# Altium PCB EXPLORER_V3.4.PcbDoc (part 3 of 4)
Units mm, origin at the board's own origin, x right, y up, seen from the top; angles counter-clockwise.
Board outline 160 x 121.01 mm, 2 copper layers (Top Layer, Bottom Layer); 254 components, 245 nets, 1181 pads, 772 vias.
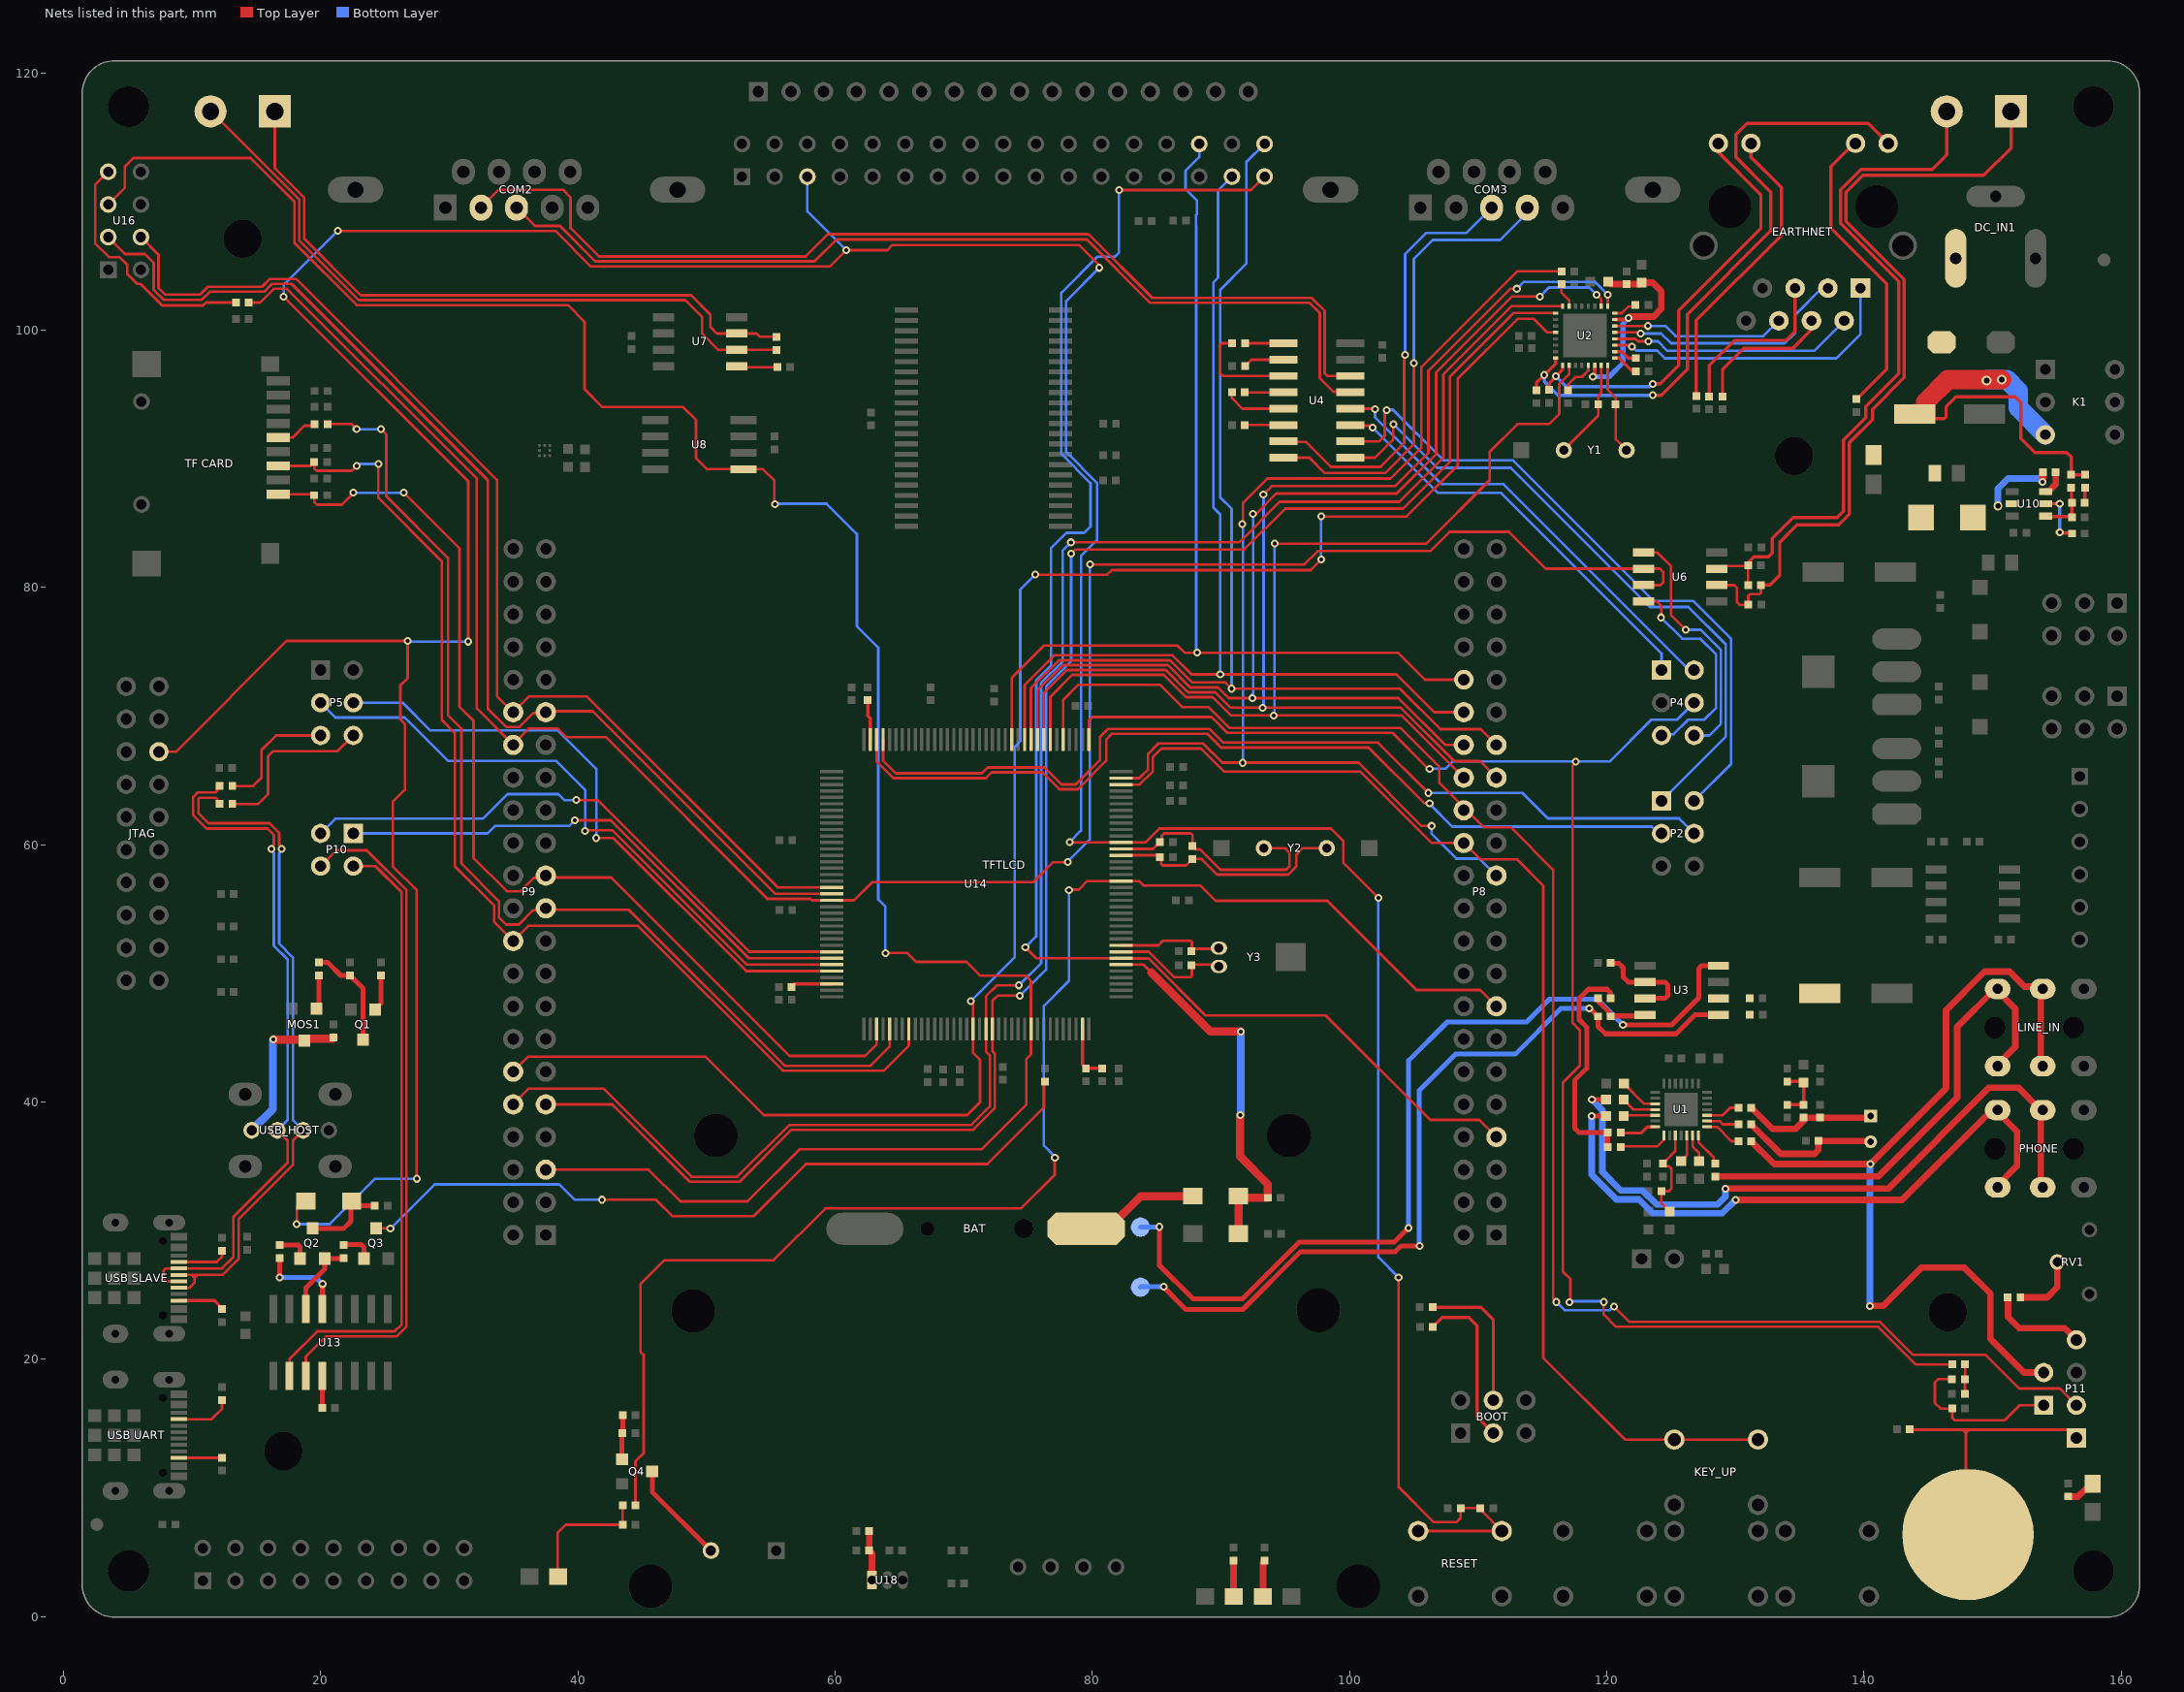
[diagram p3: the nets of this part, all layers, seen from the top]

## Via types
v1: diameter 0.61, hole 0.305, Top Layer to Bottom Layer, tented both sides, 732 vias
v2: diameter 0.762, hole 0.457, Top Layer to Bottom Layer, tented both sides, 23 vias
v3: diameter 0.6, hole 0.3, Top Layer to Bottom Layer, 12 vias
v4: diameter 0.7, hole 0.4, Top Layer to Bottom Layer, tented both sides, 5 vias

## Nets (pads, with @x,y where several pads share a name; then routed paths per layer and width w, separated by ;. In a path a pad name is that pad's centre, name@x,y a point inside that pad or via, vN(x,y) a via of type N, cw(c..) or ccw(c..) an arc to the next point about the centre after c; other vN are vias at no path point) (continued)
LIGHT_SENSOR: P8.15 R78.1 U14.19 | length 114.2
  Top Layer w0.203: R78.1@44.475,8.661 44.475,12.065 45.11,12.7 45.11,20.345 44.856,20.599 44.856,25.826 46.741,27.711 55.216,27.711 59.228,31.724 74.446,31.724 77.089,34.366 77.089,34.469 77.064,34.495 77.064,35.636 v1(77.089,35.662) ; v1(78.181,56.464) 78.231,56.514 78.942,56.514 79.611,57.183 U14.19@82.229,57.183 83.614,57.183 83.952,56.845 88.392,56.845 89.586,55.651 98.271,55.651 105.205,48.717 110.145,48.717 P8.15@111.419,47.443
  Bottom Layer w0.203: v1(77.089,35.662) 77.089,35.763 76.225,36.627 76.225,47.476 78.181,49.432 v1(78.181,56.464)
LINEIN_L: C19.1 LINE_IN.2 P1.2 | length 70.8
  Top Layer w0.508: C19.1@131.242,36.957 133.02,35.179 v1(140.487,35.179) 146.38,41.072 146.38,47.142 149.377,50.14 151.308,50.14 152.472,48.975 153.539,48.975 153.744,48.771 LINE_IN.2@153.744,42.771 ; v1(140.462,24.155) 141.478,24.155 144.45,27.127 147.81,27.127 149.835,25.103 149.835,21.59 152.451,18.974 P1.2@153.975,18.974
  Bottom Layer w0.508: v1(140.462,24.155) 140.462,35.082 140.468,35.088 140.468,35.16 v1(140.487,35.179)
LINEIN_R: C21.1 LINE_IN.1 | length 38.3
  Top Layer w0.508: C21.1@128.448,34.214 141.097,34.214 147.244,40.361 147.244,45.847 150.168,48.771 150.244,48.771 151.765,47.25 151.765,44.292 LINE_IN.1@150.244,42.771
LINK_LED: EARTHNET.12 R6.2 U2.25 | length 34.2
  Top Layer w0.254: R6.2@115.519,95.361 115.519,95.885 v1(116.053,96.418) 116.566,96.932 U2.25@116.566,97.282 ; v1(123.571,95.834) 124.155,95.834 125.603,97.282 125.603,101.524 131.978,107.899 131.978,110.541 128.68,113.839 EARTHNET.12@128.68,114.526
  Bottom Layer w0.254: v1(116.053,96.418) 116.865,95.606 123.342,95.606 v1(123.571,95.834)
MIC_N: C23.2 U1.23 | length 2.5
  Top Layer w0.203: U1.23@127.806,38.521 128.764,38.521 129.007,38.278 C23.2@130.242,38.278
MIC_P: C22.2 U1.24 | length 2.7
  Top Layer w0.203: U1.24@127.806,38.971 129.012,38.971 129.589,39.548 C22.2@130.242,39.548
NetBAT_1: BAT.1 D5.1 | length 9.3
  Top Layer w0.635: BAT.1@79.518,30.15 81.229,30.15 83.769,32.69 D5.1@87.808,32.69
NetBEEP_2: BEEP.2 Q4.3 | length 8
  Top Layer w0.381: Q4.3@45.777,11.278 45.777,9.696 BEEP.2@50.343,5.131
NetBOOT_3: BOOT.3 R73.1 | length 12.9
  Top Layer w0.254: R73.1@106.477,22.53 107.213,23.266 109.271,23.266 109.906,22.631 109.906,15.545 BOOT.3@111.176,14.275
NetBOOT_4: BOOT.4 R74.2 | length 11.4
  Top Layer w0.254: R74.2@106.461,24.054 110.211,24.054 111.176,23.089 BOOT.4@111.176,16.815
NetC3_2: C3.2 C4.2 R2.2 U1.17 | length 7.7
  Top Layer w0.203: C4.2@124.893,31.483 124.241,32.136 R2.2@124.241,33.071 124.841,33.071 125.019,33.249 125.019,34.823 124.818,35.024 124.574,35.024 C3.2@124.384,35.214 124.582,35.412 124.582,35.454 125.331,36.202 U1.17@125.331,37.396
NetC7_2: C7.2 C8.1 L1.2 U2.7 U2.30 | length 17.3
  Top Layer w0.305: v1(118.923,96.393) 119.066,96.536 U2.30@119.066,97.282 ; U2.7@120.616,100.832 121.584,100.832 v1(121.691,100.94)
  Top Layer w0.508: L1.2@120.104,103.783 120.305,103.581 C7.2@121.539,103.581 122.592,103.581 C8.1@122.707,103.696 123.583,103.696 124.231,103.048 124.231,101.651 123.649,101.069 121.82,101.069 v1(121.691,100.94)
  Bottom Layer w0.381: v1(118.923,96.393) 120.193,96.393 121.26,97.46 121.26,100.508 v1(121.691,100.94)
NetC10_1: C10.1 U1.12 | length 2.5
  Top Layer w0.203: C10.1@121.323,38.911 121.383,38.971 U1.12@123.756,38.971
NetC10_2: C10.2 PHONE.1 | length 49
  Top Layer w0.381: v1(118.821,38.913) C10.2@119.939,38.913
  Top Layer w0.508: v1(130.007,32.385) 142.951,32.385 149.939,39.373 150.244,39.373 151.892,37.725 151.892,35.021 PHONE.1@150.244,33.373
  Bottom Layer w0.508: v1(118.821,38.913) 118.821,34.366 120.752,32.436 122.504,32.436 123.584,31.356 128.978,31.356 v1(130.007,32.385)
NetC11_1: C11.1 U1.11 | length 2.7
  Top Layer w0.203: C11.1@121.323,40.181 122.083,39.421 U1.11@123.756,39.421
NetC11_2: C11.2 PHONE.2 | length 53
  Top Layer w0.381: v1(118.847,40.183) C11.2@119.939,40.183
  Top Layer w0.508: v1(129.235,33.274) 141.884,33.274 149.733,41.123 151.994,41.123 153.744,39.373 PHONE.2@153.744,33.373
  Bottom Layer w0.508: v1(118.847,40.183) 119.659,39.37 119.659,34.569 121.107,33.122 122.788,33.122 123.868,32.042 128.613,32.042 129.235,32.664 v1(129.235,33.274)
NetC12_1: C12.1 U1.15 | length 3.9
  Top Layer w0.203: C12.1@121.082,36.5 121.133,36.551 123.927,36.551 124.417,37.041 124.417,37.382 U1.15@124.431,37.396
NetC13_1: C13.1 U1.14 | length 2.9
  Top Layer w0.254: C13.1@121.082,37.643 121.133,37.592 122.659,37.592 123.138,38.071 U1.14@123.756,38.071
NetC14_1: C14.1 C15.2 R3.2 R5.2 | length 4.3
  Top Layer w0.254: R3.2@134.036,39.786 R5.2@135.306,39.786 C14.1@135.306,41.529 135.239,41.596 C15.2@134.036,41.596
NetC16_2: C16.2 U1.10 | length 3.1
  Top Layer w0.203: C16.2@121.336,41.45 122.915,39.871 U1.10@123.756,39.871
NetC17_2: C17.2 U1.19 | length 2.2
  Top Layer w0.203: C17.2@125.782,35.42 126.062,35.7 126.231,35.869 U1.19@126.231,37.396
NetC18_2: C18.2 U1.20 | length 2.2
  Top Layer w0.203: U1.20@126.681,37.396 126.681,36.54 127.178,36.043 127.178,35.422 C18.2@127.179,35.42
NetC19_2: C19.2 U1.22 | length 2.9
  Top Layer w0.203: U1.22@127.806,38.071 128.579,38.071 129.692,36.957 C19.2@130.242,36.957
NetC20_1: C20.1 C22.1 MIC1.1 R5.1 | length 10.5
  Top Layer w0.508: C22.1@131.242,39.548 131.288,39.502 132.867,37.922 134.696,37.922 135.26,38.486 135.26,38.74 R5.1@135.306,38.786 C20.1@136.576,38.786 140.386,38.786 MIC1.1@140.513,38.913
NetC21_2: C21.2 U1.21 | length 2.7
  Top Layer w0.203: U1.21@127.131,37.396 127.131,36.877 128.309,35.699 128.309,35.353 C21.2@128.448,35.214
NetC23_1: C23.1 MIC1.2 R9.1 | length 11.1
  Top Layer w0.508: C23.1@131.242,38.278 131.288,38.232 131.288,38.206 133.528,35.966 136.151,35.966 136.449,36.264 136.449,36.982 140.443,36.982 MIC1.2@140.513,36.913
NetC24_2: C24.2 U2.32 Y1.1 | length 7.2
  Top Layer w0.203: U2.32@120.066,97.282 120.066,95.377 120.691,94.751 C24.2@120.691,94.234 120.701,94.225 120.701,91.516 Y1.1@121.539,90.678
NetC25_2: C25.2 U2.31 Y1.2 | length 7.8
  Top Layer w0.203: Y1.2@116.659,90.678 119.339,93.358 C25.2@119.339,94.234 119.339,94.904 119.566,95.131 U2.31@119.566,97.282
NetC26_2: C26.2 U3.2 U3.3 | length 8.2
  Top Layer w0.381: C26.2@120.304,50.825 120.327,50.802 120.927,50.802 121.285,50.444 121.285,49.708 121.666,49.327 124.516,49.327 124.739,49.104 124.739,48.28 124.516,48.057 U3.3@122.987,48.057
NetC28_2: C28.2 U2.2 | length 1.9
  Top Layer w0.254: U2.2@120.616,98.332 121.175,98.332 121.666,97.841 C28.2@122.266,97.841
NetC29_2: C29.2 U2.29 | length 2.9
  Top Layer w0.203: C29.2@116.992,95.336 116.992,95.783 117.577,96.368 118.071,96.368 118.566,96.862 U2.29@118.566,97.282
NetC30_1: C30.1 C31.1 R13.2 U3.6
NetC32_2: C32.2 EARTHNET.4 | length 10.7
  Top Layer w0.254: 129.007,95.183 129.007,96.977 130.633,98.604 134.469,98.604 135.92,100.056 EARTHNET.4@135.92,100.736
NetC33_2: C33.2 EARTHNET.5 | length 13.2
  Top Layer w0.254: 127.965,95.183 127.965,97.257 129.921,99.212 133.934,99.212 134.65,99.929 EARTHNET.5@134.65,103.276
NetC34_2: C34.2 R17.1 R18.2 | length 2.3
  Top Layer w0.203: C34.2@147.847,17.323 R18.2@147.847,18.466 147.863,18.482 R17.1@147.863,19.609
  Top Layer w0.381: R17.1@147.847,19.593 R17.1@147.863,19.609
NetC35_2: C35.2 P1.1 R18.1 | length 13
  Top Layer w0.203: R18.1@146.847,18.466 145.771,18.466 145.517,18.212 145.517,16.612 145.948,16.18 C35.2@146.863,16.18 146.863,15.443 147.041,15.265 150.952,15.265 152.121,16.434 P1.1@153.975,16.434
NetC38_1: C38.1 U4.1 | length 3
  Top Layer w0.203: C38.1@91.872,98.984 U4.1@94.86,98.984
NetC38_2: C38.2 U4.3 | length 8.2
  Top Layer w0.203: C38.2@90.872,98.984 90.068,98.984 89.941,98.857 89.941,96.647 90.145,96.444 U4.3@94.86,96.444
NetC39_1: C39.1 U4.2 | length 3.2
  Top Layer w0.203: C39.1@91.872,97.206 92.38,97.714 U4.2@94.86,97.714
NetC40_1: C40.1 U4.5 | length 4.8
  Top Layer w0.203: C40.1@90.856,95.174 90.856,94.717 91.669,93.904 U4.5@94.86,93.904
NetC40_2: C40.2 U4.4 | length 3
  Top Layer w0.203: C40.2@91.856,95.174 U4.4@94.86,95.174
NetC41_2: C41.2 U4.6 | length 3
  Top Layer w0.203: C41.2@91.856,92.634 U4.6@94.86,92.634
NetC49_2: C49.2 MOS1.3 USB_HOST.1 | length 12.1
  Top Layer w0.635: v1(16.332,44.882) 16.358,44.856 18.638,44.856 MOS1.3@18.72,44.775 ; MOS1.3@19.132,44.932 20.913,44.932 C49.2@21.006,45.025
  Bottom Layer w0.635: USB_HOST.1@14.633,37.803 16.281,39.451 16.281,44.831 v1(16.332,44.882)
NetC50_1: C50.1 U10.6 | length 1.9
  Top Layer w0.508: U10.6@154.13,87.461 154.355,87.461 154.908,88.014 154.908,88.863 C50.1@154.954,88.909
NetC50_2: C50.2 L2.1 U10.2 | length 6
  Top Layer w0.508: v1(153.873,88.214) 153.873,88.242 153.908,88.276 153.908,88.863 C50.2@153.954,88.909
  Bottom Layer w0.508: v4(150.419,86.335) 150.419,87.681 151.206,88.468 153.592,88.468 153.846,88.214 v1(153.873,88.214)
NetC51_1: C51.1 R41.2 | length 1.2
  Top Layer w0.254: R41.2@157.171,86.583 157.189,86.601 157.189,87.741 C51.1@157.208,87.76
NetC64_1: C64.1 U13.4 | length 2.5
  Top Layer w0.381: C64.1@20.117,16.231 U13.4@20.117,18.711
NetC67_2: C67.2 R52.2 U14.24 Y2.2 | length 18.8
  Top Layer w0.203: U14.24@82.229,59.683 84.718,59.683 85.398,60.363 85.398,60.709 85.573,60.884 87.663,60.884 87.782,60.765 R52.2@87.782,59.903 88.046,59.639 88.372,59.639 89.947,58.064 95.067,58.064 95.326,58.324 95.326,59.381 94.967,59.741 Y2.2@93.342,59.741
NetC68_2: C68.2 R52.1 U14.23 Y2.1 | length 18.7
  Top Layer w0.203: U14.23@82.229,59.183 85.13,59.183 85.347,58.966 85.347,58.514 85.466,58.395 87.274,58.395 R52.1@87.782,58.903 88.49,58.903 89.709,57.683 95.225,57.683 95.86,58.318 95.86,59.229 96.372,59.741 Y2.1@98.222,59.741
NetC69_1: C69.1 U14.71 | length 3.1
  Top Layer w0.254: C69.1@62.535,71.247 62.535,70.028 62.729,69.834 U14.71@62.729,68.183
NetC70_1: C70.1 U14.106 | length 3.2
  Top Layer w0.254: C70.1@56.617,48.946 56.854,49.183 U14.106@59.729,49.183
NetC74_2: C74.2 U14.9 Y3.1 | length 8.3
  Top Layer w0.203: U14.9@82.229,52.183 85.127,52.183 85.484,52.54 87.622,52.54 87.741,52.421 87.741,51.918 89.789,51.918 Y3.1@89.84,51.968
NetC75_2: C75.2 U14.8 Y3.2 | length 9.6
  Top Layer w0.203: U14.8@82.229,51.683 84.385,51.683 84.529,51.539 84.534,51.539 86.365,49.708 87.622,49.708 87.741,49.827 87.741,50.8 87.843,50.698 89.687,50.698 Y3.2@89.84,50.546
NetCAN_1: CAN.1 R32.2 U7.7 | length 51.3
  Top Layer w0.203: CAN.1@16.434,117.018 16.434,112.588 18.72,110.302 18.72,107.112 23.114,102.718 48.793,102.718 50.292,101.219 50.292,100.254 50.8,99.746 U7.7@52.36,99.746 53.899,99.746 54.153,99.492 55.407,99.492 R32.2@55.423,99.476
NetCAN_2: CAN.2 R32.1 U7.6 | length 54.4
  Top Layer w0.203: CAN.2@11.364,117.119 18.339,110.144 18.339,106.954 22.956,102.337 48.336,102.337 49.657,101.016 49.657,99.746 50.927,98.476 U7.6@52.36,98.476 R32.1@55.423,98.476
NetCOM2_2: COM2.2 U4.14 | length 79.8
  Top Layer w0.203: COM2.2@32.461,109.525 33.858,110.922 38.837,110.922 39.421,110.338 39.421,107.95 41.631,105.74 57.709,105.74 59.436,107.467 79.629,107.467 79.654,107.442 79.736,107.442 84.664,102.514 97.059,102.514 98.069,101.504 98.069,96.647 98.273,96.444 U4.14@100.06,96.444
NetCOM2_3: COM2.3 U4.13 | length 75.1
  Top Layer w0.203: COM2.3@35.23,109.525 36.652,108.102 38.608,108.102 41.351,105.359 58.395,105.359 60.096,107.061 79.578,107.061 84.506,102.133 96.901,102.133 97.688,101.346 97.688,96.291 98.755,95.225 100.009,95.225 U4.13@100.06,95.174
NetD1_2: D1.2 Q2.3 R47.2 | length 6.8
  Top Layer w0.254: D1.2@22.342,32.248 D1.2@22.403,32.309
  Top Layer w0.381: Q2.3@19.355,30.182 21.793,30.182 22.342,30.73 22.342,32.248 22.661,31.928 R47.2@24.197,31.928
NetDC_IN1_1: DC_IN1.1 VD1.1
NetDS0_1: DS0.1 R67.1 | length 2.8
  Top Layer w0.508: DS0.1@90.982,1.576 R67.1@90.983,4.369
NetDS1_1: DS1.1 R68.1 | length 2.8
  Top Layer w0.508: DS1.1@93.27,1.573 93.27,4.243 R68.1@93.396,4.369
NetEARTHNET_10: EARTHNET.10 R15.1 | length 23.3
  Top Layer w0.254: EARTHNET.10@139.344,114.046 138.76,114.046 137.439,112.725 137.439,107.925 141.757,103.607 141.757,96.977 R15.1@139.421,94.64
NetEARTHNET_11: EARTHNET.11 R16.1 | length 23.4
  Top Layer w0.254: R16.1@126.949,94.894 126.949,100.762 133.579,107.391 133.579,111.1 131.216,113.462 EARTHNET.11@131.216,114.526
NetLS1_2: LS1.2 R76.1 R78.2 | length 10.3
  Top Layer w0.203: LS1.2@38.457,3.097 38.43,3.124 38.43,6.528 39.04,7.137 R76.1@43.485,7.137 43.475,7.147 R78.2@43.475,8.661
NetMOS1_1: MOS1.1 R38.2 | length 2.7
  Top Layer w0.381: MOS1.1@19.67,47.275 19.863,47.468 R38.2@19.863,49.851
NetP5_5: P5.5 R36.1 | length 9.7
  Top Layer w0.203: R36.1@13.132,64.567 14.732,64.567 15.392,65.227 15.392,67.361 16.535,68.504 P5.5@19.99,68.504
NetP5_6: P5.6 R37.1 | length 13.3
  Top Layer w0.203: R37.1@13.132,63.17 15.138,63.17 15.9,63.932 15.9,66.878 16.307,67.285 21.311,67.285 P5.6@22.53,68.504
NetP11_4: P11.4 R72.1 | length 7.6
  Top Layer w0.508: R72.1@151.206,24.816 151.206,23.292 152.07,22.428 155.6,22.428 P11.4@156.515,21.514
NetPWR_1: PWR.1 R69.1 | length 2.4
  Top Layer w0.508: R69.1@155.834,9.322 156.642,9.322 157.211,9.891 157.402,9.891 157.783,10.272 PWR.1@157.783,10.337
NetQ1_2: Q1.2 R40.1 | length 2.8
  Top Layer w0.381: Q1.2@24.242,47.2 24.242,47.225 24.689,47.672 R40.1@24.689,49.851
NetQ1_3: Q1.3 R38.1 R39.2 | length 8.2
  Top Layer w0.381: R38.1@19.863,50.851 20.549,50.851 21.549,49.851 R39.2@22.276,49.851 23.292,48.835 Q1.3@23.292,44.85
NetQ2_1: Q2.1 R49.2 U13.14 | length 6
  Top Layer w0.381: U13.14@18.847,23.911 18.847,25.552 20.303,27.008 20.303,27.83 Q2.1@20.305,27.832 21.72,27.832 R49.2@21.768,27.88
NetQ2_2: Q2.2 R48.1 | length 2.6
  Top Layer w0.381: R48.1@16.815,28.88 18.256,28.88 18.405,28.731 Q2.2@18.405,27.832
NetQ3_2: Q3.2 R49.1 | length 2.6
  Top Layer w0.381: R49.1@21.768,28.88 21.819,28.931 23.139,28.931 23.358,28.712 Q3.2@23.358,27.832
NetQ3_3: Q3.3 R50.2 | length 60
  Top Layer w0.203: Q3.3@24.308,30.182 v1(25.419,30.182) ; v1(41.859,32.41) 46.07,32.41 47.34,31.14 53.685,31.14 57.723,35.179 71.846,35.179 76.251,39.584 R50.2@76.251,41.691
  Bottom Layer w0.203: v1(25.419,30.182) 25.432,30.182 28.854,33.604 38.557,33.604 39.751,32.41 v1(41.859,32.41)
NetQ4_2: Q4.2 R64.2 R65.1 | length 3.4
  Top Layer w0.381: Q4.2@43.427,12.228 43.427,14.217 R65.1@43.459,14.249 43.475,14.265 R64.2@43.475,15.646
NetR4_1: R4.1 U2.8 | length 1.8
  Top Layer w0.203: U2.8@120.616,101.332 121.169,101.332 121.666,101.829 R4.1@122.225,101.829
NetR7_1: R7.1 U2.15 | length 1.9
  Top Layer w0.203: R7.1@116.484,103.581 116.484,102.921 117.066,102.339 U2.15@117.066,101.882
NetR11_1: R11.1 U2.1 | length 2.1
  Top Layer w0.254: U2.1@120.616,97.832 120.964,97.832 121.996,96.799 R11.1@122.25,96.799
NetR12_1: R12.1 R14.2 U3.4 | length 4.5
  Top Layer w0.381: R12.1@119.304,48.057 119.413,47.947 119.413,47.744 120.194,46.963 120.194,46.769 R14.2@120.304,46.66 120.342,46.698 122.898,46.698 U3.4@122.987,46.787
NetR14_1: R14.1 SP+.1 U3.5 | length 64.4
  Top Layer w0.381: v1(85.547,25.654) 85.547,25.603 87.274,23.876 91.694,23.876 96.19,28.372 103.556,28.372 104.013,28.829 v1(105.435,28.829) ; v1(118.654,47.276) 118.688,47.276 119.194,46.769 R14.1@119.304,46.66 119.309,46.654 119.309,45.892 119.901,45.301 125.387,45.301 126.873,46.787 U3.5@128.687,46.787
  Bottom Layer w0.381: SP+.1@83.744,25.603 83.795,25.654 v1(85.547,25.654) ; v1(105.435,28.829) 105.423,28.842 105.423,40.907 108.238,43.722 112.886,43.722 116.44,47.276 v1(118.654,47.276)
NetR24_1: R24.1 R30.1 RS485.2 U6.7 | length 54.5
  Top Layer w0.203: U6.7@129.365,81.674 130.95,81.674 R24.1@130.988,81.712 ; R30.1@130.988,80.188 R24.1@130.988,81.712 ; R24.1@131.016,81.969 131.016,81.74 R24.1@130.988,81.712
  Top Layer w0.254: R24.1@131.016,81.969 131.445,82.398 132.563,82.398 132.867,82.702 132.867,83.82 134.493,85.446 137.922,85.446 138.405,85.928 138.405,91.465 140.132,93.193 140.132,94.082 142.697,96.647 142.697,103.783 138.176,108.305 138.176,110.922 139.751,112.497 145.313,112.497 146.435,113.618 RS485.2@146.435,117.018
NetR26_2: R26.2 R30.2 RS485.1 U6.6 | length 62.5
  Top Layer w0.203: U6.6@128.56,80.188 129.896,80.188 130.124,79.959 130.124,78.867 130.327,78.664 R26.2@131.004,78.664 131.004,79.358 131.123,79.477 131.869,79.477 131.988,79.596 R30.2@131.988,80.188
  Top Layer w0.254: R30.2@131.988,80.188 132.699,80.188 133.452,80.941 133.452,83.515 134.798,84.861 138.024,84.861 138.862,85.7 138.862,91.262 140.665,93.066 140.665,93.853 143.129,96.317 143.129,103.962 138.608,108.483 138.608,110.743 139.904,112.039 149.301,112.039 151.435,114.173 RS485.1@151.435,117.018
NetR28_1: "TF CARD.5" R28.1 | length 3.3
  Top Layer w0.203: 16.688,91.658 17.82,91.658 18.745,92.583 19.406,92.583 R28.1@19.533,92.71
NetR33_1: "USB SLAVE.10" R33.1 | length 3.7
  Top Layer w0.254: 8.965,24.564 11.732,24.564 R33.1@12.395,23.901
NetR34_1: "USB SLAVE.4" R34.1 | length 4
  Top Layer w0.203: 8.965,27.564 11.918,27.564 12.319,27.965 R34.1@12.319,28.448
NetR35_1: R35.1 U7.5 | length 3.2
  Top Layer w0.203: U7.5@52.36,97.206 52.436,97.13 R35.1@55.499,97.13
NetR41_1: R41.1 R43.1 R44.1 U10.4 | length 4.4
  Top Layer w0.254: U10.4@154.13,85.561 154.175,85.516 156.126,85.516 R44.1@156.171,85.471 R41.1@156.171,86.583 156.142,86.612 156.142,87.731 R43.1@156.113,87.76
NetR42_1: R42.1 U10.5 | length 4.3
  Top Layer w0.254: U10.5@154.13,86.511 155.218,86.511 v1(155.217,86.512) ; v1(155.219,84.277) 155.26,84.237 156.131,84.237 R42.1@156.171,84.196
  Bottom Layer w0.254: v1@155.218,86.511 155.219,86.51 v1(155.219,84.277)
NetR45_1: "USB UART.10" R45.1 | length 3.3
  Top Layer w0.203: 8.965,12.347 R45.1@12.22,12.347
NetR46_1: "USB UART.4" R46.1 | length 4.4
  Top Layer w0.203: 8.965,15.347 11.512,15.347 12.319,16.154 R46.1@12.319,16.84
NetR48_2: R48.2 U13.13 | length 7
  Top Layer w0.381: v1(16.815,26.365) R48.2@16.815,27.88 ; U13.13@20.117,23.911 20.142,23.936 v1(20.142,25.857)
  Bottom Layer w0.381: v1(16.815,26.365) 19.634,26.365 v1(20.142,25.857)
NetR54_1: R54.1 R55.1 U14.143 | length 4.4
  Top Layer w0.254: U14.143@79.229,45.683 79.229,42.894 R54.1@79.502,42.621 R55.1@80.772,42.621
NetR66_2: R66.2 U16.8 | length 19.4
  Top Layer w0.203: U16.8@3.48,112.319 2.464,111.303 2.464,106.756 3.531,105.689 4.343,105.689 4.953,105.08 4.953,104.369 5.715,103.607 5.993,103.607 7.669,101.93 10.846,101.93 11.074,102.159 R66.2@13.402,102.159
NetR70_2: R70.2 R71.2 U18.1 | length 3.9
  Top Layer w0.508: R70.2@62.646,6.655 R71.2@62.646,5.131 62.859,4.918 U18.1@62.859,2.845
NetR72_2: R72.2 RV1.2 | length 5.2
  Top Layer w0.508: R72.2@152.165,24.816 154.243,24.816 155.031,25.603 RV1.2@155.031,27.57
NetSP-_1: SP-.1 U3.8 | length 70.3
  Top Layer w0.381: v1(85.217,30.302) 85.217,27.305 87.808,24.714 91.694,24.714 96.088,29.108 103.48,29.108 v1(104.572,30.201) ; v1(121.26,45.999) 125.044,45.999 127.152,48.108 127.152,50.374 127.376,50.597 U3.8@128.687,50.597
  Bottom Layer w0.381: SP-.1@83.744,30.277 85.192,30.277 v1(85.217,30.302) ; v1(104.572,30.201) 104.597,30.201 104.597,43.231 107.594,46.228 113.767,46.228 115.519,47.981 119.278,47.981 v1(121.26,45.999)
NRF_CE: P9.34 U14.91 U16.3 | length 88
  Top Layer w0.203: U16.3@6.02,107.239 7.391,105.867 7.391,103.302 7.925,102.768 10.606,102.768 11.216,103.378 15.432,103.378 16.042,103.988 18.085,103.988 33.706,88.367 33.706,71.563 P9.34@34.965,70.303 36.188,71.526 40.691,71.526 55.534,56.683 U14.91@59.729,56.683
NRF_CS: P9.33 U14.92 U16.4 | length 91.1
  Top Layer w0.203: U16.4@3.48,107.239 4.801,105.918 6.325,105.918 7.01,105.232 7.01,103.144 7.792,102.362 10.739,102.362 11.374,102.997 15.59,102.997 16.2,103.607 17.729,103.607 32.995,88.341 32.995,70.587 34.417,69.164 35.458,69.164 36.532,70.238 37.439,70.238 P9.33@37.505,70.303 37.585,70.383 41.148,70.383 55.348,56.183 U14.92@59.729,56.183
NRF_IRQ: P9.32 R66.1 U6.2 U6.3 U14.93 | length 169.8
  Top Layer w0.203: R66.1@14.402,102.159 15.291,102.159 16.358,103.226 17.372,103.226 32.131,88.467 32.131,70.597 P9.32@34.965,67.763 34.965,67.833 36.17,69.037 38.43,69.037 39.091,68.377 42.164,68.377 54.739,55.802 58.072,55.802 58.191,55.683 U14.93@59.729,55.683 61.474,55.683 62.89,57.099 75.413,57.099 76.962,58.649 v1(78.08,58.649) ; v1(79.807,81.815) 79.834,81.788 96.495,81.788 97.536,82.829 106.274,82.829 107.772,84.328 112.395,84.328 115.265,81.458 U6.2@122.86,81.458 124.13,81.458 124.384,81.204 124.384,80.391 124.181,80.188 U6.3@122.86,80.188
  Bottom Layer w0.203: v1(78.08,58.649) 78.08,58.717 79.807,60.444 v1(79.807,81.815)
PA0: KEY_UP.2 P8.26 U14.34 | length 95.1
  Top Layer w0.203: U14.34@82.229,64.683 83.682,64.683 84.709,65.71 84.709,66.827 85.369,67.488 88.443,67.488 90.246,65.684 100.838,65.684 106.379,60.143 P8.26@108.879,60.143 110.145,58.877 113.005,58.877 115.062,56.82 115.062,20.117 121.412,13.767 KEY_UP.2@125.25,13.767 KEY_UP.2@131.75,13.767
PA1: P8.23 R7.2 U14.35 | length 91.8
  Top Layer w0.203: U14.35@82.229,65.183 82.232,65.187 83.647,65.187 84.328,65.868 84.328,67.081 85.115,67.869 88.621,67.869 90.094,66.396 91.669,66.396 v1(91.694,66.37) 91.719,66.396 100.686,66.396 105.613,61.468 v1(106.375,61.468) ; v1@91.719,84.938 91.719,86.589 93.599,88.468 103.175,88.468 105.588,90.881 105.588,97.155 113.014,104.581 R7.2@116.484,104.581
  Bottom Layer w0.203: v1(91.694,66.37) 91.681,66.384 91.719,66.422 v1@91.719,84.938 ; v1(106.375,61.468) 106.375,60.858 108.306,58.928 110.094,58.928 P8.23@111.419,57.603
  other v1: 91.669,84.938
PA3: P4.4 R17.2 U14.37 | length 128
  Top Layer w0.203: U14.37@79.729,68.183 79.729,69.655 80,69.926 89.27,69.926 90.489,68.707 103.327,68.707 106.121,65.913 v1(106.223,65.913) ; v1(117.107,24.447) 117.17,24.511 117.17,26.244 116.586,26.828 116.586,41.504 117.907,42.824 117.907,45.598 117.348,46.157 117.348,66.15 117.577,66.378 v1(117.577,66.472) ; v1(119.761,24.46) 119.761,23.495 120.729,22.527 141.1,22.527 144.018,19.609 R17.2@146.863,19.609
  Bottom Layer w0.203: v1(106.223,65.913) 107.442,65.913 108.001,66.472 v1(117.577,66.472) 120.224,66.472 123.475,69.723 125.476,69.723 P4.4@126.797,71.044 ; v1(117.107,24.447) 117.17,24.511 119.71,24.511 v1(119.761,24.46)
PA5: P8.28 P11.2 U14.41 | length 126.2
  Top Layer w0.203: U14.41@77.729,68.183 77.729,71.246 78.923,72.441 85.246,72.441 86.973,70.714 89.022,70.714 90.647,69.088 103.937,69.088 106.985,66.04 106.985,64.821 108.879,62.927 P8.28@108.879,62.683 109.097,62.683 110.414,61.366 112.522,61.366 115.824,58.064 115.824,24.714 v1(116.078,24.46) ; v1(120.574,24.105) 121.77,22.908 141.201,22.908 141.258,22.908 143.82,20.345 149.454,20.345 152.07,17.729 155.219,17.729 P11.2@156.515,16.434
  Bottom Layer w0.203: v1(116.078,24.46) 116.713,23.825 120.239,23.825 120.518,24.105 v1(120.574,24.105)
PA7: P8.30 U2.26 U14.43 | length 84.6
  Top Layer w0.203: U14.43@76.729,68.183 76.729,71.496 78.435,73.203 85.562,73.203 87.289,71.476 89.357,71.476 90.78,70.053 v1(94.107,70.053) 104.049,70.053 P8.30@108.879,65.223 ; v1(94.183,83.414) 105.969,83.414 110.896,88.341 110.896,90.551 113.055,92.71 115.519,92.71 116.307,93.497 116.307,95.809 117.066,96.568 U2.26@117.066,97.282
  Bottom Layer w0.203: v1(94.107,70.053) 94.158,70.104 94.158,83.388 v1(94.183,83.414)
PA9: P10.3 U14.101 | length 46.1
  Top Layer w0.203: v1(39.878,63.475) 41.524,63.475 53.315,51.683 U14.101@59.729,51.683
  Bottom Layer w0.203: P10.3@19.99,60.884 21.133,62.027 32.614,62.027 34.519,63.932 38.481,63.932 38.938,63.475 v1(39.878,63.475)
PA10: P10.1 U14.102 | length 42.1
  Top Layer w0.203: v1(39.751,61.9) 42.56,61.9 53.276,51.183 U14.102@59.729,51.183
  Bottom Layer w0.203: P10.1@22.53,60.884 32.969,60.884 33.553,61.468 39.319,61.468 v1(39.751,61.9)
PA11: P5.3 U14.103 | length 50.1
  Top Layer w0.203: v1(40.564,61.087) 40.615,61.138 42.672,61.138 53.127,50.683 U14.103@59.729,50.683
  Bottom Layer w0.203: P5.3@19.99,71.044 21.133,69.901 26.518,69.901 29.896,66.523 38.303,66.523 40.564,64.262 v1(40.564,61.087)
PA12: P5.4 U14.104 | length 49
  Top Layer w0.203: v1(41.427,60.528) 42.743,60.528 53.088,50.183 U14.104@59.729,50.183
  Bottom Layer w0.203: P5.4@22.53,71.044 26.365,71.044 28.524,68.885 38.456,68.885 41.427,65.913 v1(41.427,60.528)
PB0: P8.31 TFTLCD.34 U14.46 | length 88
  Top Layer w0.203: U14.46@75.229,68.183 75.229,72.181 77.394,74.346 86.035,74.346 87.762,72.619 90.348,72.619 v1(90.83,72.136) 103.911,72.136 107.061,68.986 110.196,68.986 P8.31@111.419,67.763
  Bottom Layer w0.203: v1(90.83,72.136) 90.83,86.131 89.941,87.02 89.941,103.149 91.973,105.181 91.973,113.063 TFTLCD.34@93.394,114.484
PB1: P8.34 TFTLCD.31 U14.47 | length 80.7
  Top Layer w0.203: U14.47@74.729,68.183 74.729,72.417 77.038,74.727 86.244,74.727 87.717,73.254 v1(89.941,73.254) 103.632,73.254 106.582,70.303 P8.34@108.879,70.303
  Bottom Layer w0.203: v1(89.941,73.254) 89.941,85.7 89.408,86.233 89.408,103.708 89.774,104.074 89.774,110.864 TFTLCD.31@90.854,111.944
PB5: P9.5 U8.5 U14.135 U16.6 | length 177.3
  Top Layer w0.203: U16.6@3.48,109.779 4.775,111.074 4.775,112.725 5.436,113.386 14.559,113.386 17.958,109.987 17.958,106.796 22.798,101.956 39.218,101.956 40.513,100.66 40.513,95.428 41.91,94.031 48.184,94.031 49.174,93.04 49.174,90.068 50.038,89.205 U8.5@52.883,89.205 54.381,89.205 55.27,88.316 55.27,86.538 v1(55.321,86.487) ; P9.5@37.681,34.747 45.5,34.747 47.964,32.283 53.189,32.283 57.228,36.322 71.372,36.322 74.872,39.821 74.872,43.345 75.229,43.702 U14.135@75.229,45.683 75.229,49.434 74.828,49.835 71.272,49.835 70.206,50.902 66.294,50.902 65.608,51.587 v1(63.906,51.587)
  Bottom Layer w0.203: v1@55.287,86.512 59.334,86.512 61.697,84.15 61.697,76.987 63.348,75.336 63.348,55.753 63.906,55.194 v1(63.906,51.587)
PB10: P2.4 U14.69 | length 72.1
  Top Layer w0.203: U14.69@63.729,68.183 63.729,66.548 64.719,65.557 71.399,65.557 71.857,66.015 76.276,66.015 77.597,64.694 78.709,64.694 80.589,66.573 80.589,68.366 81.235,69.012 89.107,69.012 90.174,67.945 102.21,67.945 v1(106.121,64.033)
  Bottom Layer w0.203: v1(106.121,64.033) 113.436,64.033 115.418,62.052 125.628,62.052 P2.4@126.797,60.884
PB11: P2.3 U14.70 | length 70
  Top Layer w0.203: U14.70@63.229,68.183 63.229,66.464 64.516,65.176 71.73,65.176 72.187,65.634 76.118,65.634 77.439,64.313 78.867,64.313 81.077,66.523 81.077,68.174 81.534,68.631 88.949,68.631 90.016,67.564 101.473,67.564 105.792,63.245 106.198,63.245 v1(106.223,63.221)
  Bottom Layer w0.203: v1(106.223,63.221) 106.223,63.17 107.975,61.417 123.489,61.417 124.023,60.884 P2.3@124.257,60.884
PC4: P8.29 U2.9 U14.44 | length 98.3
  Top Layer w0.203: U14.44@76.229,68.183 76.229,71.809 78.003,73.584 85.72,73.584 87.447,71.857 89.56,71.857 90.754,70.663 v1(93.243,70.663) 103.978,70.663 108.144,66.497 110.145,66.497 P8.29@111.419,65.223 ; v1(93.294,87.224) 93.955,87.884 103.53,87.884 106.121,90.475 106.121,96.85 112.497,103.226 v1(113.005,103.226) ; U2.9@120.066,101.882 v1(120.066,102.768)
  Bottom Layer w0.203: v1(93.243,70.663) 93.32,70.739 93.32,87.198 v1(93.294,87.224) ; v1(113.005,103.226) 113.538,103.759 119.075,103.759 v1(120.066,102.768)
PC5: P8.32 U2.10 U14.45 | length 93.8
  Top Layer w0.203: U14.45@75.729,68.183 75.729,71.995 77.699,73.965 85.877,73.965 87.605,72.238 89.764,72.238 90.601,71.4 v1(92.457,71.4) 103.8,71.4 107.437,67.763 P8.32@108.879,67.763 ; v1(92.481,85.725) 92.735,85.725 94.31,87.3 103.657,87.3 106.731,90.373 106.731,96.723 112.624,102.616 v1(114.783,102.616) ; v1(119.202,102.768) 119.566,102.405 U2.10@119.566,101.882
  Bottom Layer w0.203: v1(92.457,71.4) 92.499,71.443 92.329,71.613 92.507,71.791 v1@92.507,85.725 ; v1(114.783,102.616) 115.494,103.327 118.643,103.327 v1(119.202,102.768)
PC10: "TF CARD.1" P9.23 R21.2 U14.111 | length 82.1
  Top Layer w0.203: 16.688,87.258 19.412,87.258 R21.2@19.498,87.173 19.498,86.649 19.71,86.436 21.641,86.436 22.53,87.325 v1(22.53,87.376) ; v1(26.441,87.376) 30.785,83.033 30.785,70.739 31.877,69.647 31.877,58.979 34.468,56.388 35.535,56.388 36.558,57.412 37.313,57.412 P9.23@37.505,57.603 37.654,57.455 42.596,57.455 56.464,43.586 62.337,43.586 63.229,44.478 U14.111@63.229,45.683
  Bottom Layer w0.203: v1(22.53,87.376) 22.533,87.372 26.623,87.372 26.619,87.376 v1(26.441,87.376)
PC12: P9.21 R28.2 U14.113 | length 84.3
  Top Layer w0.203: R28.2@20.533,92.71 22.403,92.71 v1(22.784,92.329) ; v1(24.689,92.304) 25.095,91.897 25.095,87.097 29.896,82.296 29.896,70.079 30.937,69.037 30.937,58.547 33.858,55.626 33.858,54.356 34.417,53.797 35.408,53.797 36.532,54.921 37.363,54.921 P9.21@37.505,55.063 37.628,54.94 43.962,54.94 56.078,42.824 62.743,42.824 64.229,44.31 U14.113@64.229,45.683
  Bottom Layer w0.203: v1(22.784,92.329) 22.809,92.304 v1(24.689,92.304)
PC13: P8.7 TFTLCD.33 U14.7 | length 119.9
  Top Layer w0.203: v1(74.79,52.032) 75.639,51.183 U14.7@82.229,51.183 82.254,51.158 84.377,51.158 88.798,46.736 98.151,46.736 106.279,38.608 110.094,38.608 P8.7@111.419,37.283 ; v1(82.067,110.896) 92.346,110.896 TFTLCD.33@93.394,111.944
  Bottom Layer w0.203: v1(74.79,52.032) 75.641,52.883 75.641,72.796 76.784,73.939 76.784,83.058 77.978,84.252 79.375,84.252 79.858,84.734 79.858,88.113 77.586,90.384 77.586,102.91 80.391,105.715 81.737,105.715 82.067,106.045 v1(82.067,110.896)
PD2: "TF CARD.3" P9.20 R23.2 U14.116 | length 88.2
  Top Layer w0.203: 16.688,89.458 19.201,89.458 R23.2@19.498,89.755 19.498,89.265 19.685,89.078 22.428,89.078 v1(22.809,89.459) ; v1(24.486,89.611) 24.486,86.97 29.413,82.042 29.413,69.698 30.429,68.682 30.429,58.344 33.477,55.296 33.477,54.011 P9.20@34.965,52.523 36.137,53.696 44.668,53.696 55.92,42.443 63.794,42.443 65.729,44.378 U14.116@65.729,45.683
  Bottom Layer w0.203: v1(22.809,89.459) 22.962,89.611 v1(24.486,89.611)
PF11: P8.36 TFTLCD.30 U14.49 | length 82.5
  Top Layer w0.203: U14.49@73.729,68.183 73.736,68.191 73.736,73 76.225,75.489 86.619,75.489 87.178,74.93 v1(88.138,74.93) 103.759,74.93 105.856,72.833 P8.36@108.89,72.833
  Bottom Layer w0.203: v1(88.138,74.93) 88.075,74.993 88.075,108.104 88.049,108.129 88.049,108.939 88.138,109.028 88.138,110.084 87.249,110.973 87.249,112.396 88.314,113.461 TFTLCD.30@88.314,114.484
PG11: P9.12 U2.20 U14.126 | length 137.4
  Top Layer w0.203: P9.12@34.965,42.363 36.137,43.536 49.896,43.536 54.443,38.989 70.268,38.989 71.268,39.989 71.268,43.286 70.729,43.825 U14.126@70.729,45.683 70.729,47.61 70.536,47.803 v1(70.536,47.834) ; v1(75.56,81.001) 81.153,81.001 81.509,81.356 96.977,81.356 v1(97.79,82.169) ; v1(97.79,85.522) 104.445,85.522 108.407,89.484 108.407,96.229 113.067,100.889 114.325,100.889 115.382,99.832 U2.20@115.914,99.832
  Bottom Layer w0.203: v1(70.536,47.834) 73.965,51.263 73.965,67.615 74.397,68.047 74.397,79.837 v1(75.56,81.001) ; v1(97.79,82.169) v1(97.79,85.522)
PG13: P9.10 U2.16 U14.128 | length 139.9
  Top Layer w0.203: P9.10@34.965,39.823 36.188,41.046 41.986,41.046 48.844,34.188 52.4,34.188 56.439,38.227 70.583,38.227 72.03,39.673 72.03,43.623 71.729,43.924 U14.128@71.729,45.683 71.729,48.208 72.593,49.073 v1(74.295,49.073) ; v1(78.334,83.515) 91.415,83.515 94.564,86.665 103.861,86.665 107.29,90.094 107.29,96.571 112.598,101.879 116.462,101.879 U2.16@116.464,101.882
  Bottom Layer w0.203: v1(74.295,49.073) 76.022,50.8 76.022,72.593 77.699,74.27 77.699,82.88 v1(78.334,83.515)
PG14: P9.9 U2.17 U14.129 | length 136
  Top Layer w0.203: P9.9@37.505,39.823 42.67,39.823 48.686,33.807 52.558,33.807 56.597,37.846 70.741,37.846 72.411,39.516 72.411,43.781 72.229,43.963 U14.129@72.229,45.683 72.229,47.87 72.644,48.285 74.346,48.285 v1(74.371,48.26) ; v1(78.359,82.626) 78.689,82.956 91.821,82.956 94.996,86.131 104.165,86.131 107.798,89.764 107.798,96.368 112.776,101.346 115.9,101.346 U2.17@115.914,101.332
  Bottom Layer w0.203: P9.9@37.301,39.619 P9.9@37.505,39.823 ; v1(74.371,48.26) 76.403,50.292 76.403,72.314 78.359,74.27 v1(78.359,82.626)
RESET: C65.2 D1.1 JTAG.15 R51.1 RESET.1 TFTLCD.5 U14.25 | length 331.7
  Top Layer w0.203: JTAG.15@7.417,67.234 8.738,67.234 17.348,75.844 v1(26.752,75.844) 26.752,72.955 26.196,72.399 26.196,69.739 26.543,69.393 26.543,64.262 25.603,63.322 25.603,58.318 27.457,56.464 v1(27.457,34.036) ; v1(17.12,102.616) 31.471,88.265 v1(31.471,75.794) ; v1(18.136,30.505) 18.136,31.852 18.72,32.436 D1.1@18.847,32.309 ; v1(21.336,107.721) 38.242,107.721 41.01,104.953 59.588,104.953 v1(60.858,106.223) 64.053,106.223 64.46,106.629 78.969,106.629 80.543,105.054 v1(80.543,104.851) ; v1(78.235,60.222) 78.338,60.222 78.376,60.183 U14.25@82.229,60.183 84.114,60.183 85.196,61.265 98.552,61.265 99.517,60.3 99.517,58.598 v1(102.235,55.88) ; v1(103.809,26.365) 103.809,10.084 106.553,7.341 108.306,7.341 108.636,7.671 R51.1@108.636,8.433 C65.2@110.176,8.433 110.374,8.234 110.374,8.114 RESET.1@111.834,6.655 RESET.1@105.334,6.655
  Bottom Layer w0.203: v1(17.12,102.616) 17.12,103.505 v1(21.336,107.721) ; v1(18.136,30.505) 20.701,30.505 24.232,34.036 v1(27.457,34.036) ; v1(26.752,75.844) 26.777,75.87 26.854,75.794 v1(31.471,75.794) ; TFTLCD.5@57.836,111.938 57.836,109.245 v1(60.858,106.223) ; v1(78.235,60.222) 79.121,61.108 79.121,82.448 80.366,83.693 80.366,88.036 80.358,88.036 80.358,88.151 77.967,90.542 77.967,102.275 v1(80.543,104.851) ; v1(102.235,55.88) 102.235,27.94 v1(103.809,26.365)
RS485_RX: P4.5 U6.4 | length 17.1
  Top Layer w0.203: U6.4@122.86,78.918 123.901,78.918 124.231,78.588 v1(124.231,77.673)
  Bottom Layer w0.203: v1(124.231,77.673) 125.882,76.022 127.254,76.022 128.499,74.778 128.499,70.663 127.559,69.723 126.314,69.723 125.193,68.601 124.354,68.601 P4.5@124.257,68.504
RS485_TX: P4.6 U6.1 | length 19.7
  Top Layer w0.203: U6.1@122.758,82.829 U6.1@122.86,82.728 123.927,82.728 124.993,81.661 124.993,77.851 v1(126.136,76.708)
  Bottom Layer w0.203: v1(126.136,76.708) 127.305,76.708 128.88,75.133 128.88,69.393 127.991,68.504 P4.6@126.797,68.504
RXD: P10.4 U13.3 | length 52.7
  Top Layer w0.203: U13.3@18.847,18.711 18.847,20.218 20.422,21.793 25.913,21.793 26.67,22.55 26.67,56.464 23.571,59.563 21.209,59.563 P10.4@19.99,58.344
SPEED_LED: EARTHNET.9 R8.2 U2.24 | length 50.9
  Top Layer w0.254: R8.2@114.529,95.336 114.529,95.91 v1(115.138,96.52) 116.016,97.398 U2.24@116.016,97.832 ; v1(123.571,94.945) 124.231,94.945 126.263,96.977 126.263,101.244 132.766,107.747 132.766,110.744 130.048,113.462 130.048,115.214 130.912,116.078 140.329,116.078 EARTHNET.9@141.88,114.526
  Bottom Layer w0.254: v1(115.138,96.52) 115.138,96.012 116.205,94.945 v1(123.571,94.945)
SPK_IN: C12.2 C13.2 R12.2 | length 17.9
  Top Layer w0.381: C12.2@120.082,36.5 C13.2@120.082,37.643 117.831,37.643 117.5,37.973 117.5,41.681 118.44,42.621 118.44,45.826 117.856,46.41 117.856,48.057 118.567,48.768 120.024,48.768 120.304,48.489 R12.2@120.304,48.057
TPAD: P11.1 R77.1 TPAD.1 | length 22.1
  Top Layer w0.152: R77.1@143.561,14.58 R77.1@143.612,14.529 ; P11.1@155.88,14.529 P11.1@156.515,13.894
  Top Layer w0.203: R77.1@143.612,14.529 147.676,14.529 ; 147.904,14.3 147.676,14.529 ; 147.955,14.3 148.184,14.529 ; TPAD.1@148.082,6.375 147.93,6.528 147.93,14.529 ; P11.1@155.88,14.529 148.184,14.529 ; 147.676,14.529 147.93,14.529 ; 147.93,14.529 148.184,14.529
TPRX+: EARTHNET.3 U2.5 | length 19.5
  Top Layer w0.203: U2.5@120.616,99.832 122.545,99.832 v1(122.631,99.746)
  Bottom Layer w0.203: v1(122.631,99.746) 124.231,99.746 124.993,98.984 133.833,98.984 134.645,99.797 134.645,101.194 136.728,103.276 EARTHNET.3@137.19,103.276
TPRX-: EARTHNET.6 U2.6 | length 13.6
  Top Layer w0.203: U2.6@120.616,100.332 120.665,100.381 120.715,100.33 v1(123.215,100.33)
  Bottom Layer w0.203: v1(123.215,100.33) 124.562,100.33 125.349,99.543 132.187,99.543 EARTHNET.6@133.38,100.736
TPTX+: EARTHNET.1 U2.3 | length 23.9
  Top Layer w0.203: U2.3@120.616,98.832 121.869,98.832 v1(121.971,98.73)
  Bottom Layer w0.203: v1(121.971,98.73) 122.276,98.425 123.901,98.425 124.511,97.815 137.846,97.815 139.73,99.7 EARTHNET.1@139.73,103.276
TPTX-: EARTHNET.2 U2.4 | length 19.2
  Top Layer w0.203: U2.4@120.616,99.332 122.219,99.332 122.415,99.136 v1(123.241,99.136)
  Bottom Layer w0.203: v1(123.241,99.136) 123.977,99.136 124.714,98.4 136.124,98.4 EARTHNET.2@138.46,100.736
TXD: P10.2 U13.2 | length 49.3
  Top Layer w0.203: U13.2@17.577,18.711 17.577,20.015 19.736,22.174 25.756,22.174 26.289,22.708 26.289,56.306 24.252,58.344 P10.2@22.53,58.344
U2_RX: P4.1 U4.11 | length 32.8
  Top Layer w0.203: U4.11@100.06,92.634 100.116,92.578 101.546,92.578 101.693,92.431 v1(101.803,92.431)
  Bottom Layer w0.203: v1(101.803,92.431) 106.883,87.351 111.785,87.351 124.257,74.879 P4.1@124.257,73.584
U2_TX: P4.2 U4.12 | length 35.7
  Top Layer w0.203: U4.12@100.06,93.904 101.93,93.904 v1(101.981,93.853)
  Bottom Layer w0.203: v1(101.981,93.853) 101.981,93.218 107.163,88.036 111.969,88.036 126.609,73.396 P4.2@126.797,73.584
U3_232RX: COM3.4 U4.8 | length 36.7
  Top Layer w0.203: U4.8@94.86,90.094 96.876,90.094 98.069,88.9 102.768,88.9 105.004,91.135 v1(105.004,97.434)
  Bottom Layer w0.203: v1(105.004,97.434) 105.004,105.537 106.477,107.01 111.709,107.01 113.817,109.118 COM3.4@113.817,109.525
U3_232TX: COM3.3 U4.7 | length 33.9
  Top Layer w0.203: U4.7@94.86,91.364 94.911,91.313 96.622,91.313 98.552,89.383 102.413,89.383 104.242,91.211 104.242,97.993 v1(104.318,98.069)
  Bottom Layer w0.203: v1(104.318,98.069) 104.318,105.918 105.956,107.556 109.08,107.556 COM3.3@111.049,109.525
U3_RX: P2.2 U4.10 | length 53
  Top Layer w0.203: U4.10@100.06,91.364 102.311,91.364 102.743,91.796 102.743,93.751 102.882,93.89 v1(102.882,93.802)
  Bottom Layer w0.203: v1(102.882,93.802) 102.902,93.822 103.358,93.822 107.29,89.891 112.7,89.891 123.622,78.969 126.695,78.969 129.667,75.997 129.667,66.294 P2.2@126.797,63.424
U3_TX: P2.1 U4.9 | length 52.3
  Top Layer w0.203: U4.9@100.06,90.094 101.981,90.094 103.403,91.516 v1(103.403,92.71)
  Bottom Layer w0.203: v1(103.403,92.71) 106.807,89.306 112.547,89.306 123.368,78.486 126.34,78.486 129.261,75.565 129.261,68.428 P2.1@124.257,63.424
USB_DM: "USB SLAVE.5" "USB SLAVE.7" R36.2 USB_HOST.2 | length 54.4
  Top Layer w0.203: 8.965,26.064 7.997,26.064 7.772,26.289 7.772,26.873 7.964,27.064 8.965,27.064 12.335,27.064 13.208,27.937 13.208,31.059 17.43,35.281 17.43,37.006 USB_HOST.2@16.633,37.803 ; R36.2@12.132,64.567 11.943,64.378 11.943,64.191 11.824,64.072 10.441,64.072 10.084,63.714 10.084,62.29 11.109,61.265 15.85,61.265 16.358,60.757 16.358,59.978 16.154,59.775 v1(16.154,59.665)
  Bottom Layer w0.203: v1(16.154,59.665) 16.154,59.555 16.358,59.351 16.358,52.156 17.43,51.084 17.43,38.6 USB_HOST.2@16.633,37.803
USB_DP: "USB SLAVE.6" "USB SLAVE.8" R37.2 USB_HOST.3 | length 54
  Top Layer w0.203: 8.965,25.564 9.791,25.564 10.185,25.959 10.185,26.314 ; 8.965,26.564 9.935,26.564 ; 10.439,26.564 10.435,26.564 ; R37.2@12.132,63.17 11.943,63.359 11.943,63.546 11.824,63.665 10.609,63.665 10.49,63.546 10.49,62.459 11.278,61.671 16.018,61.671 16.764,60.925 16.764,59.978 16.967,59.775 v1(16.967,59.665) ; USB_HOST.3@18.633,37.803 17.836,37.006 17.836,35.112 13.614,30.891 13.614,27.805 12.374,26.564 10.435,26.564 ; 9.935,26.564 10.262,26.564 ; 9.935,26.564 10.185,26.314 ; 10.185,26.314 10.185,26.488 10.262,26.564 ; 10.185,26.314 10.435,26.564 ; 10.262,26.564 10.435,26.564
  Bottom Layer w0.203: v1(16.967,59.665) 16.967,59.555 16.764,59.351 16.764,52.324 17.836,51.252 17.836,38.6 USB_HOST.3@18.633,37.803
VBAT: C73.1 D4.2 D5.2 U14.6 | length 30.6
  Top Layer w0.203: U14.6@82.229,50.683 83.988,50.683 84.582,50.089
  Top Layer w0.635: 84.582,50.089 89.185,45.485 v1(91.542,45.485) ; D4.2@91.364,29.769 D5.2@91.364,32.69 91.491,32.563 C73.1@93.65,32.563 93.65,33.604 91.491,35.763 v1(91.491,38.989)
  Bottom Layer w0.635: v1(91.491,38.989) 91.542,39.04 v1(91.542,45.485)
VBTN: C51.2 C52.1 C55.1 F1.2 K1.3 L2.2 R43.2 | length 33.4
  Top Layer w0.254: C52.1@145.186,93.116 146.231,93.116 146.38,93.265 146.38,94.056 147.142,94.818 151.765,94.818 152.197,94.386 152.197,91.592 153.289,90.5 155.753,90.5 156.113,90.14 R43.2@156.113,88.76 C51.2@157.208,88.76
  Top Layer w1.524: C52.1@143.96,93.497 C52.1@144.786,93.497 ; C52.1@144.798,93.63 144.798,94.429 146.533,96.164 149.53,96.164 v2(150.698,96.164)
  Bottom Layer w1.524: v2@149.581,96.164 v2(150.698,96.164) 151.101,96.164 151.994,95.272 151.994,93.98 K1.3@154.102,91.872
  other v2: 149.53,96.088

## Text inside footprints (layer, text, board x,y; h text height)
"TF CARD": Top Overlay "Cd" at 15.392,96.377 h0.76 r180; Top Overlay "8" at 14.834,95.031 h0.76 r270; Top Overlay "7" at 14.808,93.913 h0.76 r270; Top Overlay "6" at 14.808,92.846 h0.76 r270; Top Overlay "5" at 14.808,91.779 h0.76 r270; Top Overlay "4" at 14.783,90.713 h0.76 r270; Top Overlay "3" at 14.783,89.519 h0.76 r270; Top Overlay "2" at 14.783,88.452 h0.76 r270; Top Overlay "1" at 14.757,87.36 h0.76 r270
TFTLCD: Top Overlay "BL" at 80.315,109.652 h0.71; Top Overlay "MISO" at 87.046,109.652 h0.71; Top Overlay "TCS" at 92.507,109.652 h0.71; Top Overlay "MO" at 90.406,116.038 h0.71; Top Overlay "MOSI" at 87.156,116.038 h0.71; Top Overlay "CLK" at 92.406,116.038 h0.71; Top Overlay "PEN" at 89.967,109.652 h0.71; Top Overlay "D11" at 72.314,109.652 h0.71; Top Overlay "GND" at 84.76,109.652 h0.71; Top Overlay "GND" at 77.281,116.038 h0.71; Top Overlay "RD" at 54.781,116.038 h0.71; Top Overlay "D0" at 57.406,116.038 h0.71; Top Overlay "D10" at 69.656,116.038 h0.71; Top Overlay "VDD" at 79.781,116.038 h0.71; Top Overlay "GND" at 82.281,116.038 h0.71; Top Overlay "VDD" at 84.906,116.038 h0.71; Top Overlay "VDD" at 82.347,109.652 h0.71; Top Overlay "D15" at 77.394,109.652 h0.71; Top Overlay "D12" at 72.281,116.038 h0.71; Top Overlay "D13" at 74.781,109.642 h0.71; Top Overlay "D9" at 69.901,109.652 h0.71; Top Overlay "D8" at 67.156,116.038 h0.71; Top Overlay "D6" at 65.031,116.038 h0.71; Top Overlay "D5" at 64.948,109.652 h0.71; Top Overlay "D4" at 62.406,116.038 h0.71; Top Overlay "D3" at 62.408,109.652 h0.71; Top Overlay "D2" at 59.906,116.038 h0.71; Top Overlay "D1" at 59.995,109.652 h0.71; Top Overlay "RST" at 56.947,109.652 h0.71; Top Overlay "WR" at 54.788,109.652 h0.71; Top Overlay "CS" at 52.248,109.652 h0.71; Top Overlay "RS" at 52.281,116.038 h0.71; Top Overlay "D7" at 67.361,109.652 h0.71; Top Overlay "D14" at 74.781,116.038 h0.71; Top Overlay "BL" at 80.313,109.658 h0.71; Top Overlay "MISO" at 87.044,109.658 h0.71; Top Overlay "TCS" at 92.505,109.658 h0.71; Top Overlay "MO" at 90.404,116.044 h0.71; Top Overlay "MOSI" at 87.154,116.044 h0.71; Top Overlay "CLK" at 92.404,116.044 h0.71; Top Overlay "PEN" at 89.965,109.658 h0.71; Top Overlay "D11" at 72.312,109.658 h0.71; Top Overlay "GND" at 84.758,109.658 h0.71; Top Overlay "GND" at 77.279,116.044 h0.71; Top Overlay "RD" at 54.779,116.044 h0.71; Top Overlay "D0" at 57.404,116.044 h0.71; Top Overlay "D10" at 69.654,116.044 h0.71; Top Overlay "VDD" at 79.779,116.044 h0.71; Top Overlay "GND" at 82.279,116.044 h0.71; Top Overlay "VDD" at 84.904,116.044 h0.71; Top Overlay "VDD" at 82.345,109.658 h0.71; Top Overlay "D15" at 77.392,109.658 h0.71; Top Overlay "D12" at 72.279,116.044 h0.71; Top Overlay "D9" at 69.899,109.658 h0.71; Top Overlay "D8" at 67.154,116.044 h0.71; Top Overlay "D6" at 65.029,116.044 h0.71; Top Overlay "D5" at 64.946,109.658 h0.71; Top Overlay "D4" at 62.404,116.044 h0.71; Top Overlay "D3" at 62.406,109.658 h0.71; Top Overlay "D2" at 59.904,116.044 h0.71; Top Overlay "D1" at 59.993,109.658 h0.71; Top Overlay "RST" at 56.945,109.658 h0.71; Top Overlay "WR" at 54.786,109.658 h0.71; Top Overlay "CS" at 52.246,109.658 h0.71; Top Overlay "RS" at 52.279,116.044 h0.71; Top Overlay "D7" at 67.359,109.658 h0.71; Top Overlay "D14" at 74.779,116.044 h0.71
U9: Top Overlay "Y" at 37.16,92.177 h0.76; Top Overlay "X" at 35.382,90.399 h0.76